# Altium PCB ES.PcbDoc (part 2 of 2)
Units mm, origin at the board's own origin, x right, y up, seen from the top; angles counter-clockwise.
Board outline 100.25 x 100.25 mm, 2 copper layers (Top Layer, Bottom Layer); 101 components, 47 nets, 272 pads, 52 vias.
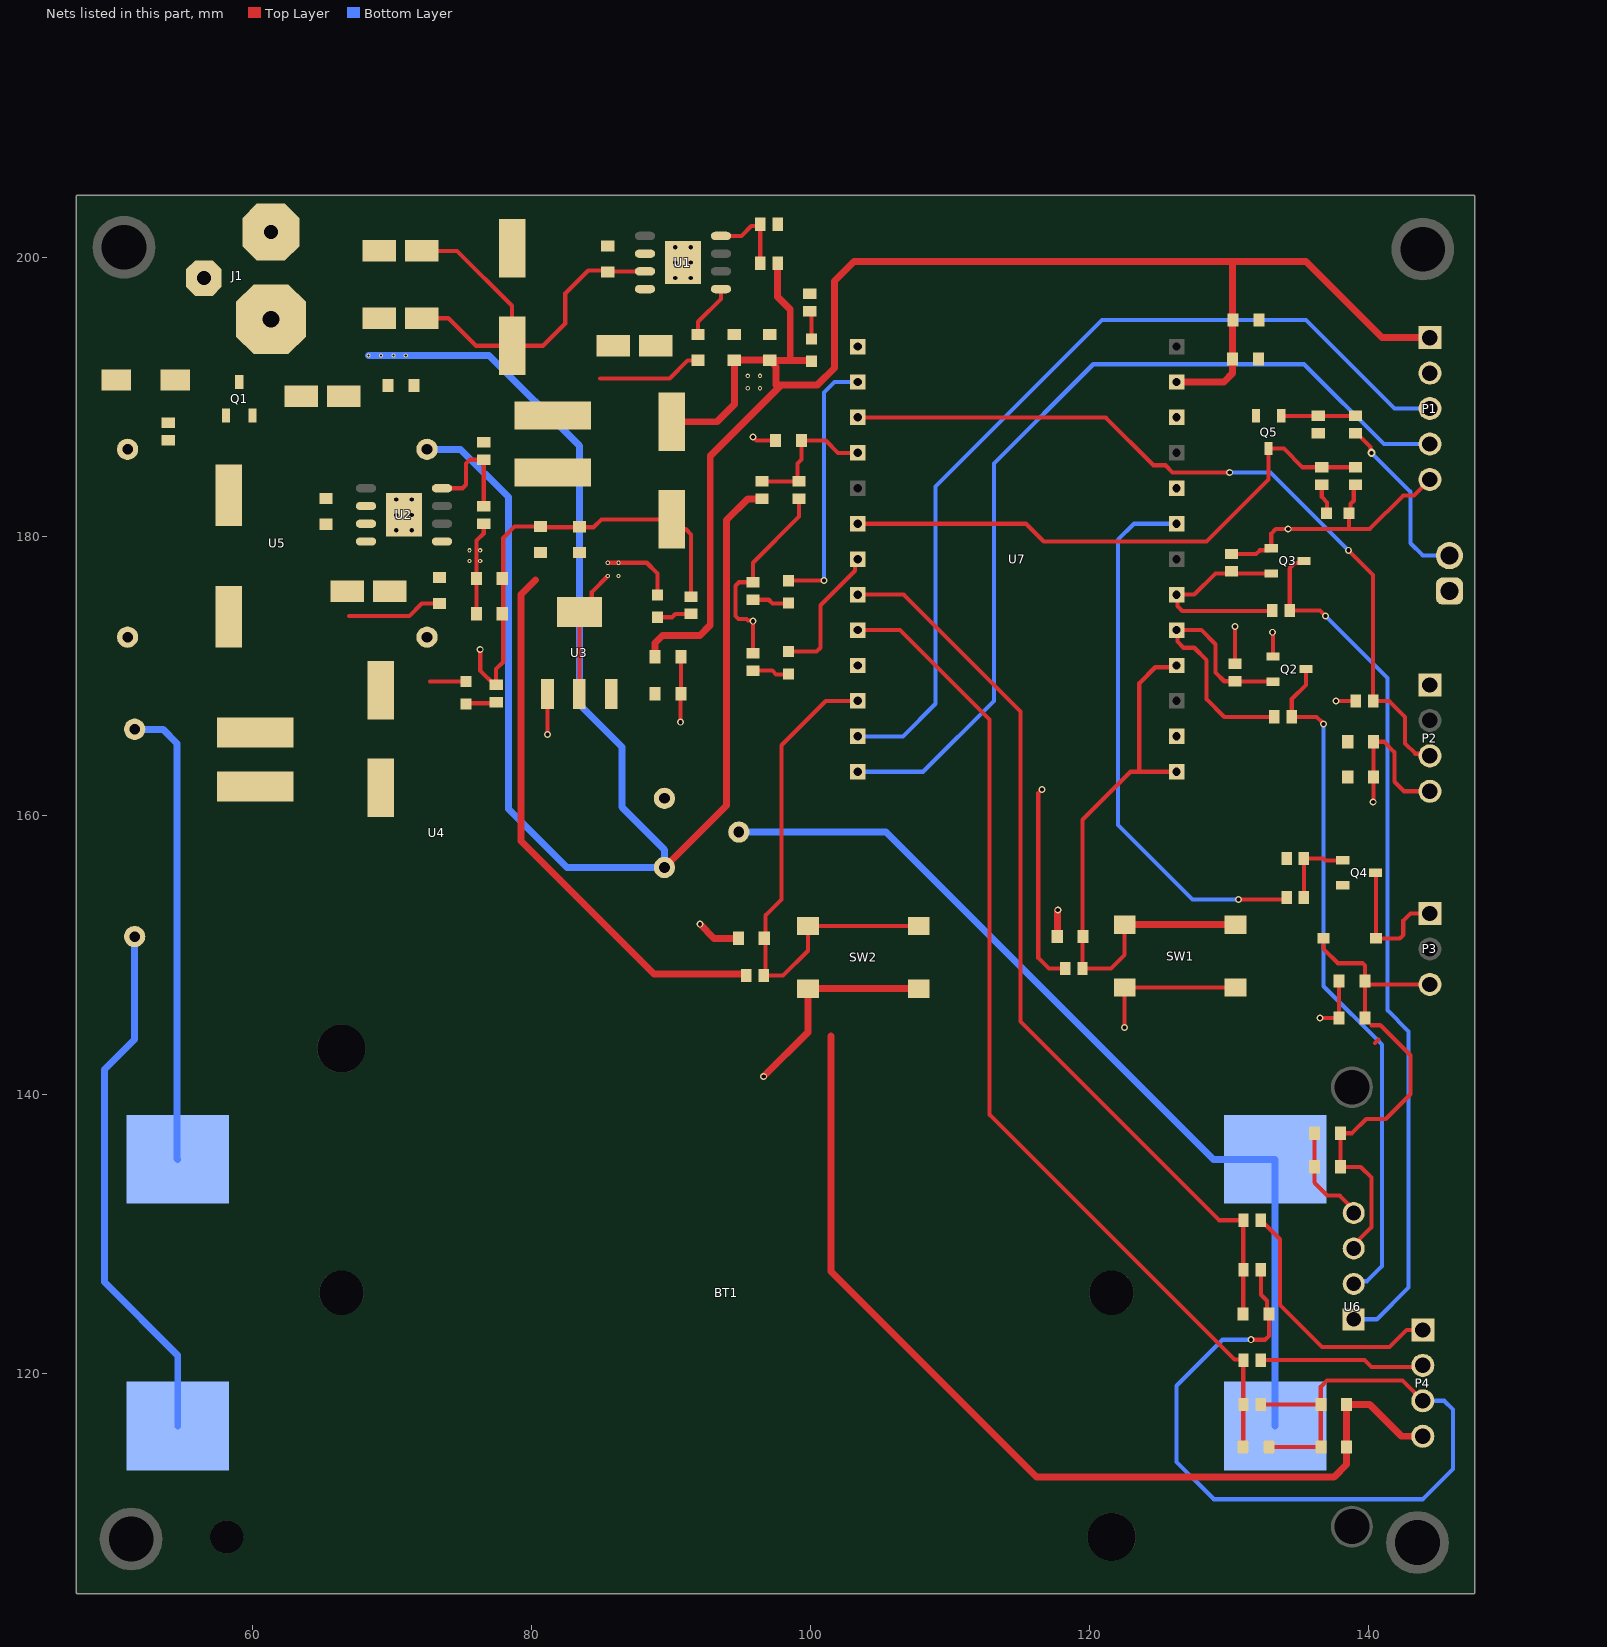
[diagram p2: the nets of this part, all layers, seen from the top]

## Part data (continued)
J1: "Power Barrel Connector Jack 2mm ID 5.8mm OD Through Hole, Right Angle", LCSC Part #=C5155559, Manufacturer=G-Switch, Operating Temperature Max="+85 C", Operating Temperature Min="-40 C", Rated Current=7A, Supplier 1 Part Number=N/A, Voltage Rating DC=35V, ComponentLink1Description="Datasheet link", ComponentLink1URL=https://www.lcsc.com/datasheet/C5155559.pdf, Manufacturer Part Number=DC-005H-D020, Mount=THT, Number of Pins=3, Packaging="Through Hole", Supplier 1=Mouser, Supplier 1 URL=N/A, Supplier 2=Digi-Key, Supplier 2 Part Number=N/A, Supplier 2 URL=N/A, Supplier 3=thegioiic, Supplier 3 Part Number=N/A, Supplier 3 URL=N/A
J2: library part 691210910002, "WR-TBL Series 2109 Horizontal Entry, THT, pitch 2.54mm, 2p", LCSC Part #=N/A, Manufacturer="Wurth Elektronik", Operating Temperature Max=105°C, Operating Temperature Min=-40°C, Rated Current=6A, Working Voltage=150V, Application="Rising Cage Clamp", Category="Terminal Blocks", ComponentLink1Description=Datasheet, ComponentLink1URL=https://www.we-online.com/redexpert/spec/691210910002?ad, Manufacturer Part Number=691210910002, Match Code=WR-TBL, Modularity=No, Mount="Through Hole", Number of Pins=2, Number of Rows=1, Orientation=Horizontal, Packaging=Box, Pitch=2.54mm, Supplier 1=Mouser, Supplier 1 Part Number=N/A, Supplier 1 URL=N/A, Supplier 2=Digi-Key, Supplier 2 Part Number=N/A, Supplier 2 URL=N/A, Supplier 3=thegioiic, Supplier 3 Part Number=N/A, Supplier 3 URL=https://www.thegioiic.com/kf128-2-v-domino-2-chan-thang-2-54mm-150v-6a-han-pcb
L1: library part 784774116, "WE-PD2A SMT Power Inductor, size 5832, 15uH, 1.53A", DC Resistance max.=0.14Ohm, DC Resistance typ.=0.089Ohm, Inductance=15uH, LCSC Part #=N/A, Manufacturer="Wurth Elektronik", Manufacturer Part Number=784774115, Operating Temperature="-40 to +125degC", Rated Current=1.53A, Rated Voltage=80VDC, Saturation Current=1.9A, Self Resonant Frequency=20MHz, Supplier 1 Part Number=710-784774115, Supplier 2 Part Number=732-6832-2-ND, ComponentLink1Description=Datasheet, ComponentLink1URL=https://www.we-online.com/catalog/datasheet/784774156.pdf, Mount=SMD/SMT, Packaging="Tape and Reel", Published Date="May 2020", Size=5848, Supplier 1=Mouser, Supplier 1 URL=https://www.mouser.vn/ProductDetail/Wurth-Elektronik/784774115?qs=sBf%2Fb4nBSleoo7TtqR8SIg%3D%3D, Supplier 2=Digi-Key, Supplier 2 URL=https://www.digikey.com/en/products/detail/w%C3%BCrth-elektronik/784774115/5168867?s=N4IgTCBcDaIOwA4Asc5IIzoKwgLoF8g, Supplier 3=thegioiic, Supplier 3 Part Number=N/A, Supplier 3 URL=https://www.thegioiic.com/cuon-cam-dan-smd-cd53-5852-150-15uh-1-7a
L2: library part 784774068, "WE-PD2A SMT Power Inductor, size 5848, 6.8uH, 2.4A", DC Resistance max.=0.082Ohm, DC Resistance typ.=0.071Ohm, Inductance=6.8uH, LCSC Part #=N/A, Manufacturer="Wurth Elektronik", Operating Temperature="-40 to +125degC", Rated Current=2.4A, Rated Voltage=80VDC, Saturation Current=5A, Self Resonant Frequency=28MHz, Supplier 1 Part Number=710-784774068, Supplier 2 Part Number=732-6829-2-ND, ComponentLink1Description=Datasheet, ComponentLink1URL=https://www.we-online.com/catalog/datasheet/784774156.pdf, Manufacturer Part Number=784774068, Mount=SMD/SMT, Packaging="Tape and Reel", Published Date="May 2020", Size=5848, Supplier 1=Mouser, Supplier 1 URL=https://www.mouser.vn/ProductDetail/Wurth-Elektronik/784774068?qs=sBf%2Fb4nBSlfEjoZazogbYQ%3D%3D, Supplier 2=Digi-Key, Supplier 2 URL=https://www.digikey.com/en/products/detail/w%C3%BCrth-elektronik/784774068/5168865?s=N4IgTCBcDaIOwA4Asc5IAwDYEgLoF8g, Supplier 3=thegioiic, Supplier 3 Part Number=N/A, Supplier 3 URL=https://www.thegioiic.com/cuon-cam-dan-smd-cd53-5852-6r8-6-8uh-2-2a
P1: library part 61300511021, "WR-PHD Pin Header, THT, pitch 2.54mm, Single Row, Angled, 5p", Contact Resistance=20mOhm, LCSC Part #=N/A, Manufacturer="Wurth Elektronik", Operating Temperature Max="+ 85 C", Operating Temperature Min="- 25 C", Rated Current=3A, Supplier 1 Part Number=710-61300511021, Withstanding Voltage=500VAC, Working Voltage=250VAC, ComponentLink1Description=Datasheet, ComponentLink1URL=https://www.we-online.com/catalog/datasheet/61300511021.pdf, Gender="Pin Header", Manufacturer Part Number=61300511021, Mount=THT, Orientation=Angled, Packaging=Bag, Pin Number=5, Pitch=2.54mm, Row Number=Single, Supplier 1=Mouser, Supplier 1 URL=https://www.mouser.vn/ProductDetail/Wurth-Elektronik/61300511021?qs=PhR8RmCirEazneNRFf2Thg%3D%3D, Supplier 2=Digi-Key, Supplier 2 Part Number=N/A, Supplier 2 URL=N/A, Supplier 3=thegioiic, Supplier 3 Part Number=N/A, Supplier 3 URL=N/A
P2 P4: library part 61300411021, "WR-PHD Pin Header, THT, pitch 2.54mm, Single Row, Angled, 4p", Contact Resistance=20mOhm, LCSC Part #=N/A, Manufacturer="Wurth Elektronik", Operating Temperature Max="+ 85 C", Operating Temperature Min="- 25 C", Rated Current=3A, Supplier 1 Part Number=710-61300411021, Withstanding Voltage=500VAC, Working Voltage=250VAC, ComponentLink1Description=Datasheet, ComponentLink1URL=https://www.we-online.com/catalog/datasheet/61300411021.pdf, Gender="Pin Header", Manufacturer Part Number=61300411021, Mount=THT, Orientation=Angled, Packaging=Bag, Pin Number=4, Pitch=2.54mm, Row Number=Single, Supplier 1=Mouser, Supplier 1 URL=https://www.mouser.vn/ProductDetail/Wurth-Elektronik/61300411021?qs=PhR8RmCirEZA1t3zcLZqlA%3D%3D, Supplier 2=Digi-Key, Supplier 2 Part Number=N/A, Supplier 2 URL=N/A, Supplier 3=thegioiic, Supplier 3 Part Number=N/A, Supplier 3 URL=N/A
P3: library part 61300311021, "WR-PHD Pin Header, THT, pitch 2.54mm, Single Row, Angled, 3p", Contact Resistance=20mOhm, LCSC Part #=N/A, Manufacturer="Wurth Elektronik", Operating Temperature Max="+ 85 C", Operating Temperature Min="- 25 C", Rated Current=3A, Supplier 1 Part Number=710-61300311021, Withstanding Voltage=500VAC, Working Voltage=250VAC, ComponentLink1Description=Datasheet, ComponentLink1URL=https://www.we-online.com/catalog/datasheet/61300311021.pdf, Gender="Pin Header", Manufacturer Part Number=61300311021, Mount=THT, Orientation=Angled, Packaging=Bag, Pin Number=3, Pitch=2.54mm, Row Number=Single, Supplier 1=Mouser, Supplier 1 URL=https://www.mouser.vn/ProductDetail/Wurth-Elektronik/61300311021?qs=PhR8RmCirEbNJ%252BPpVpFqFw%3D%3D, Supplier 2=Digi-Key, Supplier 2 Part Number=N/A, Supplier 2 URL=N/A, Supplier 3=thegioiic, Supplier 3 Part Number=N/A, Supplier 3 URL=N/A
Q1: "MOSFET MOSFT P-Ch -30V -3A 98mOhm 9.5nC Log Lvl", Continuous Drain Current="-3 A", Drain to Source Voltage (Vdss)="-30 V", Drain-to-Source On-Resistance="165 mOhms", Gate Threshold Voltage (Vth)="-4 V", Gate-to-Source Voltage (VGS)=±20V, LCSC Part #=C2592, Manufacturer="Infineon Technologies", Operating Temperature Max="+ 150 C", Operating Temperature Min="- 55 C", Package / Case=SOT-23-3, Power Dissipation="1.25 W", Supplier 1 Part Number=942-IRLML5203TRPBF, Supplier 2 Part Number=N/A, ComponentLink1Description=Datasheet, ComponentLink1URL=https://www.mouser.com/datasheet/2/196/Infineon_IRLML5203_DataSheet_v01_01_EN-3363405.pdf, FET Type=P-Channel, Manufacturer Part Number=IRLML5203TRPBF, Mount=SMD/SMT, Packaging="Tape and Reel", Supplier 1=Mouser, Supplier 1 URL=https://www.mouser.com/ProductDetail/Infineon-Technologies/IRLML5203TRPBF?qs=9%252BKlkBgLFf2C8TWZ3Ajzqg%3D%3D, Supplier 2=Digi-Key, Supplier 2 URL=N/A, Supplier 3=thegioiic, Supplier 3 Part Number=N/A, Supplier 3 URL=N/A, Total Gate Charge="9.5 nC"
Q2 Q3 Q4 Q5: "MOSFETs 300mW 50V DSS", Continuous Drain Current="200 mA", Drain to Source Voltage (Vdss)="50 V", Drain-to-Source On-Resistance="3.5 Ohms", Gate Threshold Voltage (Vth)="1.2 V", Gate-to-Source Voltage (VGS)=±20V, LCSC Part #=C40912, Manufacturer="Diodes Incorporated", Operating Temperature Max="+ 150 C", Operating Temperature Min="- 50 C", Package / Case=SOT-23-3, Power Dissipation="300 mW", Supplier 1 Part Number=621-BSS138-7-F, Supplier 2 Part Number=BSS138-FDITR-ND, Supplier 3 Part Number=N/A, ComponentLink1Description=Datasheet, ComponentLink1URL=https://www.mouser.com/datasheet/2/115/ds30144-3214779.pdf, FET Type=N-Channel, Manufacturer Part Number=BSS138-7-F, Mount=SMD/SMT, Packaging="Tape and Reel", Supplier 1=Mouser, Supplier 1 URL=https://www.mouser.com/ProductDetail/Diodes-Incorporated/BSS138-7-F?qs=TJSU9qitBVRAP5gIAnNy0g%3D%3D, Supplier 2=Digi-Key, Supplier 2 URL=https://www.digikey.com/en/products/detail/diodes-incorporated/BSS138-7-F/717723, Supplier 3=thegioiic, Supplier 3 URL=N/A, Total Gate Charge=N/A
R1 R4 R15 R19 R27: library part 0006031031, "RES, size 0603, 10 kOhm, 1/10 W, 1%", LCSC Part #=C98220, Manufacturer=YAGEO, Manufacturer Part Number=RC0603FR-0710KL, Operating Temperature Max="+ 85 C", Operating Temperature Min="- 40 C", Package / Case=0603, Rated Power="1/10 W", Resistance="10 kOhm", Supplier 1 Part Number=N/A, Supplier 2 Part Number=311-10.0KHRTR-ND, Tolerance=+/-1%, ComponentLink1Description=Datasheet, ComponentLink1URL=https://fscdn.rohm.com/en/products/databook/datasheet/passive/resistor/chip_resistor/esr-e.pdf, Mount=SMD/SMT, Packaging="Tape and Reel", Supplier 1=Mouser, Supplier 1 URL=N/A, Supplier 2=Digi-Key, Supplier 2 URL=https://www.digikey.com/en/products/detail/yageo/rc0603fr-0710kl/726880, Supplier 3=thegioiic, Supplier 3 Part Number=N/A, Supplier 3 URL=https://www.thegioiic.com/dien-tro-10-kohm-0603-1-
R2: library part 0006031045, "RES, size 0603, 100 kOhm, 1/10 W, 5%", LCSC Part #=C100048, Manufacturer=YAGEO, Manufacturer Part Number=RC0603JR-07100KL, Operating Temperature Max="+ 85 C", Operating Temperature Min="- 40 C", Package / Case=0603, Rated Power="1/10 W", Resistance="100 kOhm", Supplier 1 Part Number=603-RC0603JR-07100KL, Supplier 2 Part Number=311-100KGRTR-ND, Supplier 3 Part Number=OEM, Tolerance=+/-5%, ComponentLink1Description=Datasheet, ComponentLink1URL=https://www.mouser.vn/datasheet/2/447/YAGEO_PYu_RC_Group_51_RoHS_L_12-3313492.pdf, Mount=SMD/SMT, Packaging="Tape and Reel", Supplier 1=Mouser, Supplier 1 URL=https://www.mouser.vn/ProductDetail/YAGEO/RC0603JR-07100KL?qs=2cAdsCoAWRG9Rhqklpdeqg%3D%3D, Supplier 2=Digi-Key, Supplier 2 URL=https://www.digikey.com/en/products/detail/yageo/rc0603jr-07100kl/726698, Supplier 3=thegioiic, Supplier 3 URL=https://www.thegioiic.com/dien-tro-100-kohm-0603-5
R3 R5: library part 0006033321, "RES, size 0603, 3.3 kOhm, 1/10 W, 1%", LCSC Part #=C108078, Manufacturer=YAGEO, Manufacturer Part Number=RC0603FR-073K3L, Operating Temperature Max="+ 85 C", Operating Temperature Min="- 40 C", Package / Case=0603, Rated Power="1/10 W", Resistance="3.3 kOhm", Supplier 1 Part Number=603-RC0603FR-073K3L, Supplier 2 Part Number=311-3.30KHRTR-ND, Supplier 3 Part Number=N/A, Tolerance=+/-1%, ComponentLink1Description=Datasheet, ComponentLink1URL=https://api.pim.na.industrial.panasonic.com/file_stream/main/fileversion/4484, Mount=SMD/SMT, Packaging="Tape and Reel", Supplier 1=Mouser, Supplier 1 URL=https://www.mouser.vn/ProductDetail/YAGEO/RC0603FR-073K3L?qs=gt6vzsuosg2EoNiKbtAsfQ%3D%3D, Supplier 2=Digi-Key, Supplier 2 URL=https://www.digikey.com/en/products/detail/yageo/rc0603fr-073k3l/727126, Supplier 3=thegioiic, Supplier 3 URL=https://www.thegioiic.com/dien-tro-3-3-kohm-0603-1-
R6 R8 R10 R16 R17 R20 R21: library part 0006033011, "RES, size 0603, 300 Ohm, 1/10 W, 1%", LCSC Part #=N/A, Manufacturer=OEM, Operating Temperature Max="+ 85 C", Operating Temperature Min="- 40 C", Package / Case=0603, Rated Power="1/10 W", Resistance="300 Ohm", Supplier 1 Part Number=755-SDR03EZPF3000, Supplier 2 Part Number=13-RC0603FR-10300RLTR-ND, Tolerance=+/-1%, ComponentLink1Description=Datasheet, ComponentLink1URL=N/A, Manufacturer Part Number=OEM, Mount=SMD/SMT, Packaging="Tape and Reel", Supplier 1=Mouser, Supplier 1 URL=https://www.mouser.vn/ProductDetail/ROHM-Semiconductor/SDR03EZPF3000?qs=MyNHzdoqoQKYsGXohuNk8Q%3D%3D, Supplier 2=Digi-Key, Supplier 2 URL=https://www.digikey.com/en/products/detail/yageo/RC0603FR-10300RL/14008461, Supplier 3=thegioiic, Supplier 3 Part Number=N/A, Supplier 3 URL=N/A
R7: library part 0006034731, "RES, size 0603, 47 kOhm, 1/10 W, 1%", LCSC Part #=C105579, Manufacturer=YAGEO, Manufacturer Part Number=RC0603FR-0747KL, Operating Temperature Max="+ 155 C", Operating Temperature Min="- 55 C", Package / Case=0603, Rated Power="1/10 W", Resistance="47 kOhm", Supplier 1 Part Number=603-RC0603FR-0747KL, Supplier 2 Part Number=311-47.0KHRTR-ND, Supplier 3 Part Number=N/A, Tolerance=+/-1%, ComponentLink1Description=Datasheet, ComponentLink1URL=https://www.mouser.com/datasheet/2/447/YAGEO_PYu_RC_Group_51_RoHS_L_12-3313492.pdf, Mount=SMD/SMT, Packaging="Tape and Reel", Supplier 1=Mouser, Supplier 1 URL=https://www.mouser.com/ProductDetail/YAGEO/RC0603FR-0747KL?qs=gt6vzsuosg3jXzmCiDCCdg%3D%3D, Supplier 2=Digi-Key, Supplier 2 URL=https://www.digikey.com/en/products/detail/yageo/rc0603fr-0747kl/727253, Supplier 3=thegioiic, Supplier 3 URL=N/A
R9: library part 0006031041, "RES, size 0603, 100 kOhm, 1/10 W, 1%", LCSC Part #=C14675, Manufacturer=YAGEO, Manufacturer Part Number=RC0603FR-07100KL, Operating Temperature Max="+ 85 C", Operating Temperature Min="- 40 C", Package / Case=0603, Rated Power="1/10 W", Resistance="100 kOhm", Supplier 1 Part Number=603-RC0603FR-07100KL, Supplier 2 Part Number=311-100KHRTR-ND, Supplier 3 Part Number="100 KOhm 0603 1% (UNI-ROYALOHM)", Tolerance=+/-1%, ComponentLink1Description=Datasheet, ComponentLink1URL=https://www.mouser.vn/datasheet/2/447/YAGEO_PYu_RC_Group_51_RoHS_L_12-3313492.pdf, Mount=SMD/SMT, Packaging="Tape and Reel", Supplier 1=Mouser, Supplier 1 URL=https://www.mouser.vn/ProductDetail/YAGEO/RC0603FR-07100KL?qs=e1ok2LiJcmaihem8Va5%2Fsw%3D%3D, Supplier 2=Digi-Key, Supplier 2 URL=https://www.digikey.com/en/products/detail/yageo/rc0603fr-07100kl/726889, Supplier 3=thegioiic, Supplier 3 URL=https://www.thegioiic.com/dien-tro-100-kohm-0603-1-
R11 R12: library part 0006030001, "RES, size 0603, 0 Ohm, 1/10 W, 1%", LCSC Part #=C192909, Manufacturer=YAGEO, Manufacturer Part Number=AC0603FR-070RL, Operating Temperature Max="+ 85 C", Operating Temperature Min="- 40 C", Package / Case=0603, Rated Power="1/10 W", Resistance="0 Ohm", Supplier 1 Part Number=603-AC0603FR-070RL, Supplier 2 Part Number=311-0.0LDTR-ND, Supplier 3 Part Number=N/A, Tolerance=+/-1%, ComponentLink1Description=Datasheet, ComponentLink1URL=https://www.mouser.com/datasheet/2/447/Yageo_06282023_ACseries-3224032.pdf, Mount=SMD/SMT, Packaging="Tape and Reel", Supplier 1=Mouser, Supplier 1 URL=https://www.mouser.com/ProductDetail/YAGEO/AC0603FR-070RL?qs=sGAEpiMZZMtlubZbdhIBIOG3KwTtqrl%2FD2D%252BGuMCfoY%3D, Supplier 2=Digi-Key, Supplier 2 URL=https://www.digikey.com/en/products/detail/yageo/ac0603fr-070rl/2827812, Supplier 3=thegioiic, Supplier 3 URL=https://www.thegioiic.com/dien-tro-0-ohm-0603-1-
R13 R14: library part 0006034721, "RES, size 0603, 4.7 kOhm, 1/10 W, 1%", LCSC Part #=C99782, Manufacturer=YAGEO, Manufacturer Part Number=RC0603FR-074K7L, Operating Temperature Max="+ 85 C", Operating Temperature Min="- 40 C", Package / Case=0603, Rated Power="1/10 W", Resistance="4.7 kOhm", Supplier 1 Part Number=603-RC0603FR-074K7L, Supplier 2 Part Number=N/A, Tolerance=+/-1%, ComponentLink1Description=Datasheet, ComponentLink1URL=https://www.mouser.vn/datasheet/2/447/YAGEO_PYu_RC_Group_51_RoHS_L_12-3313492.pdf, Mount=SMD/SMT, Packaging="Tape and Reel", Supplier 1=Mouser, Supplier 1 URL=https://www.mouser.vn/ProductDetail/YAGEO/RC0603FR-074K7L?qs=gt6vzsuosg37y0l7Vt36bQ%3D%3D, Supplier 2=Digi-Key, Supplier 2 URL=N/A, Supplier 3=thegioiic, Supplier 3 Part Number=N/A, Supplier 3 URL=N/A
R18 R22 R23 R26: library part 0006031021, "RES, size 0603, 1 kOhm, 1/10 W, 1%", LCSC Part #=C22548, Manufacturer=YAGEO, Manufacturer Part Number=RC0603FR-071KL, Operating Temperature Max="+ 85 C", Operating Temperature Min="- 40 C", Package / Case=0603, Rated Power="1/10 W", Resistance="1 kOhm", Supplier 1 Part Number=603-RC0603FR-071KL, Supplier 2 Part Number=311-1.00KHRTR-ND, Supplier 3 Part Number=N/A, Tolerance=+/-1%, ComponentLink1Description=Datasheet, ComponentLink1URL=https://www.yageo.com/upload/media/product/productsearch/datasheet/rchip/PYu-SR_20105_RoHS_L_10.pdf, Mount=SMD/SMT, Packaging="Tape and Reel", Supplier 1=Mouser, Supplier 1 URL=https://www.mouser.vn/ProductDetail/YAGEO/RC0603FR-071KL?qs=VU8sRB4EgwApHsk4rF%2F3zg%3D%3D, Supplier 2=Digi-Key, Supplier 2 URL=https://www.digikey.com/en/products/detail/yageo/rc0603fr-071kl/726843, Supplier 3=thegioiic, Supplier 3 URL=N/A
R24 R25: library part 0006032235, "RES, size 0603, 22 kOhm, 1/10 W, 5%", LCSC Part #=C114065, Manufacturer=YAGEO, Manufacturer Part Number=RC0603FR-0722KL, Operating Temperature Max="+ 85 C", Operating Temperature Min="- 40 C", Package / Case=0603, Rated Power="1/10 W", Resistance="22 kOhm", Supplier 1 Part Number=603-RC0603FR-0722KL, Supplier 2 Part Number=311-22.0KHRTR-ND, Supplier 3 Part Number=N/A, Tolerance=+/-5%, ComponentLink1Description=Datasheet, ComponentLink1URL=https://www.mouser.vn/datasheet/2/315/Panasonic_Resistors_Thick_Film_Anti_Sulf_Anti_Surg-1825099.pdf, Mount=SMD/SMT, Packaging="Tape and Reel", Supplier 1=Mouser, Supplier 1 URL=https://www.mouser.vn/ProductDetail/YAGEO/RC0603FR-0722KL?qs=diQw95jMAeO86nsIZoklhA%3D%3D, Supplier 2=Digi-Key, Supplier 2 URL=https://www.digikey.com/en/products/detail/yageo/rc0603fr-0722kl/727056, Supplier 3=thegioiic, Supplier 3 URL=https://www.thegioiic.com/dien-tro-22-kohm-0603-5
R28 R29: library part 0006033835, "RES, size 0603, 38 kOhm, 1/10 W, 5%", LCSC Part #=N/A, Manufacturer=OEM, Operating Temperature Max="+ 85 C", Operating Temperature Min="- 40 C", Package / Case=0603, Rated Power="1/10 W", Resistance="38 kOhm", Tolerance=+/-5%, ComponentLink1Description=Datasheet, ComponentLink1URL=N/A, Manufacturer Part Number=OEM, Mount=SMD/SMT, Packaging="Tape and Reel", Supplier 1=Mouser, Supplier 1 Part Number=N/A, Supplier 1 URL=N/A, Supplier 2=Digi-Key, Supplier 2 Part Number=N/A, Supplier 2 URL=N/A, Supplier 3=thegioiic, Supplier 3 Part Number=N/A, Supplier 3 URL=N/A
SW1 SW2: "WS-TASV SMT Tact Switch, L6 x W6 x H4.3mm, 260g, SPST-NO, 12V, 50mA", LCSC Part #=N/A, Manufacturer="Wurth Elektronik", Operating Temperature Max=85°C, Operating Temperature Min=-40°C, Package / Case=0805, Rated Current=50mA, Rated Voltage=12VDC, Supplier 1 Part Number=710-430152043826, Supplier 2 Part Number=732-6991-2-ND, Supplier 3 Part Number=OEM, Category="Tact Switches", Circuit=SPST-NO, ComponentLink1Description=Datasheet, ComponentLink1URL=https://www.we-online.com/redexpert/spec/430152043826?ad, Contact Material="Stainless Steel", Height=4.3mm, Length=6mm, Manufacturer Part Number=430152043826, Match Code=WS-TASV, Mount="Surface Mount", Operation Force=260g, Packaging="Tape and Reel", Supplier 1=Mouser, Supplier 1 URL=https://www.mouser.vn/ProductDetail/Wurth-Elektronik/430152043826?qs=wr8lucFkNMUjBcFj1giTsA%3D%3D, Supplier 2=Digi-Key, Supplier 2 URL=https://www.digikey.com/en/products/detail/w%C3%BCrth-elektronik/430152043826/5208994, Supplier 3=thegioiic, Supplier 3 URL=https://www.thegioiic.com/nut-nhan-6x6mm-cao-4-3mm-4-chan-smd, Terminal Material="Copper Alloy", Terminal Plating=Silver, Washable=No, Width=6mm
U1 U2: library part TPS5430DDAR, "5.5V to 36V Input, 3A, 500kHz Step-Down Converter", LCSC Part #=C9864, Manufacturer="Texas Instruments", Operating Temperature Max="+ 85 C", Operating Temperature Min="- 40 C", Output Current="3 A", Package / Case=WSON-10, Supplier 1 Part Number=595-TPS5430DDAR, Supplier 2 Part Number=296-26988-2-ND, Supplier 3 Part Number=TPS5430DDA, Switching Frequency="500 kHz", Voltage Input Maximum=36V, Voltage Input Minimum=5.5V, Voltage Output="1.22V - 32V", ComponentLink1Description=Datasheet, ComponentLink1URL=https://www.ti.com/lit/gpn/TPS5430, Manufacturer Part Number=TPS5430DDAR, Mount=SMD/SMT, Number of Outputs=1, Packaging="Tape and Reel", Supplier 1=Mouser, Supplier 1 URL=https://www.mouser.com/ProductDetail/Texas-Instruments/TPS5430DDAR?qs=zwk82MlA57ZJdOTovH1aYA%3D%3D, Supplier 2=Digi-Key, Supplier 2 URL=https://www.digikey.com/en/products/detail/texas-instruments/tps5430ddar/1671816, Supplier 3=thegioiic, Supplier 3 URL=https://www.thegioiic.com/tps5430dda-ic-dieu-chinh-giam-ap-3a-8-soic
U3: library part AMS1117-3.3V, "1A 60dB@(120Hz) Fixed 3.3V Positive electrode 12V SOT-223 Linear Voltage Regulators (LDO) ROHS", Current Input Maximum=N/A, Current Output Maximum=1A, LCSC Part #=C347222, Manufacturer=AMS, Operating Temperature Max="+ 85 C", Operating Temperature Min="- 40 C", Voltage Input Maximum=15V, Voltage Output=3.3V, ComponentLink1Description=Datasheet, ComponentLink1URL=http://www.advanced-monolithic.com/pdf/ds1117.pdf, Manufacturer Part Number=N/A, Mount=SMD/SMT, Packaging="Tape and Reel", Pad Count=4, Supplier 1=Mouser, Supplier 1 Part Number=N/A, Supplier 1 URL=N/A, Supplier 2=Digi-Key, Supplier 2 Part Number=N/A, Supplier 2 URL=N/A, Supplier 3=thegioiic, Supplier 3 Part Number=N/A, Supplier 3 URL=https://www.thegioiic.com/ams1117-3-3v-ic-on-ap-3-3v-1a-sot-223
U5: library part TP5100_MODULE
U7: "Embedded serial port to Ethernet module", Package=None, Check_prices=https://www.snapeda.com/parts/WT32-ETH01/Wireless-Tag/view-part/?ref=eda, MF=wireless-tag, MP=WT32-ETH01, SnapEDA_Link=https://www.snapeda.com/parts/WT32-ETH01/Wireless-Tag/view-part/?ref=snap

## Via types
v1: diameter 0.5, hole 0.3, Top Layer to Bottom Layer, 35 vias
v2: diameter 0.3, hole 0.15, Top Layer to Bottom Layer, 16 vias
v3: diameter 0.6, hole 0.3, Top Layer to Bottom Layer, 1 vias

## Nets (pads, with @x,y where several pads share a name; then routed paths per layer and width w, separated by ;. In a path a pad name is that pad's centre, name@x,y a point inside that pad or via, vN(x,y) a via of type N, cw(c..) or ccw(c..) an arc to the next point about the centre after c; other vN are vias at no path point)
3V3: C10.2 C11.2 C21.2 C22.2 D9.2 D13.2 P1.5 P2.4 Q2.1 Q3.1 R13.1 R14.1 R15.2 R16.1 R17.1 R22.2 U3.2 U3.4 | length 107.6
  Top Layer w0.3: U3.2@83.443,168.722 U3.4@83.443,174.582 ; U3.4@84.328,175.457 U3.4@84.318,175.457 ; v2(85.471,177.165) 84.328,176.022 84.328,175.467 U3.4@84.318,175.457 ; v2(85.471,178.12) v2(86.233,178.12) 88.265,178.12 89.033,177.352 D9.2@89.033,175.806 ; v1(116.586,161.864) 116.332,161.61 116.332,149.799 117.088,149.043 R16.1@118.247,149.043 ; R14.1@130.175,178.745 131.943,178.745 132.207,179.009 132.894,179.009 Q3.1@133.032,179.147 133.032,180.215 133.35,180.533 v1(134.239,180.533) 138.557,180.533 ; R13.1@130.429,170.871 v1(130.429,173.548) ; v1@133.096,173.167 133.159,173.104 Q2.1@133.159,171.4 ; v1(137.668,168.214) R15.2@139.075,168.214 ; R22.2@139.065,183.708 138.938,183.581 138.938,182.565 138.713,182.34 138.713,181.784 D13.2@138.595,181.666 138.595,180.571 138.557,180.533 ; v1(140.335,160.975) 140.347,160.987 140.347,162.741 C22.2@140.359,162.753 C21.2@140.359,165.293 141.097,165.293 141.859,164.531 141.859,162.42 142.543,161.737 P2.4@144.399,161.737 ; P1.5@144.399,184.089 143.256,182.946 142.494,182.946 140.081,180.533 138.557,180.533 ; U3.4@83.443,174.582 U3.4@84.318,175.457 ; U3.4@83.443,174.582 83.443,175.457 U3.4@84.318,175.457
  Top Layer w0.5: 80.303,176.888 79.248,175.834 79.248,158.181 88.773,148.656 95.262,148.656 95.387,148.531 R17.1@95.387,148.529
  other v1: 133.128,173.135
  other v2: 86.233,177.165
5V: C4.1 C5.2 C6.2 C8.2 C9.2 C19.2 C20.2 C23.2 C24.2 C25.2 C26.2 C29.2 C30.2 D8.2 D10.2 L1.2 P1.1 P3.3 P4.4 R1.2 U3.3 U6.2 U7.5V | length 224.2
  Top Layer w0.3: D10.2@136.779,151.196 136.779,150.434 137.795,149.418 139.56,149.418 139.736,149.242 C25.2@139.736,148.148 C25.2@139.736,148.144 ; C19.2@137.981,134.686 C20.2@137.981,137.232 138.817,137.232 139.833,138.248 141.23,138.248 143.002,140.02 143.002,142.814 140.843,144.973 140.208,144.973 ; C19.2@137.981,134.819 139.44,134.819 140.208,134.051 140.208,130.495 U6.2@138.684,128.971 ; C26.2@139.736,145.481 C25.2@139.736,148.144 ; 140.462,143.703 140.716,143.957 ; P3.3@144.399,147.894 139.986,147.894 C25.2@139.736,148.144
  Top Layer w0.5: C9.2@88.864,171.389 88.864,172.369 89.408,172.913 92.075,172.913 92.818,173.656 92.818,185.782 97.91,190.874 ; C4.1@90.043,188.224 93.289,188.224 94.542,189.477 C6.2@94.542,192.635 C5.2@97.082,192.635 ; R1.2@97.653,199.583 97.653,197.18 98.552,196.281 98.552,192.598 ; D8.2@100.076,192.56 100.038,192.597 98.551,192.597 97.12,192.597 C5.2@97.082,192.635 ; 101.473,144.211 101.473,127.32 116.205,112.588 137.541,112.588 138.431,113.477 C30.2@138.431,114.741 C29.2@138.431,117.789 140.087,117.789 142.367,115.509 P4.4@143.891,115.509 ; U7.5V@126.238,191.074 129.628,191.074 130.253,191.698 C24.2@130.253,192.719 130.253,199.71 ; P1.1@144.399,194.249 140.97,194.249 135.509,199.71 130.253,199.71 ; C5.2@97.082,192.635 97.157,192.635 97.307,192.485 97.307,192.41 97.529,192.188 97.529,190.874 97.91,190.874 ; 97.91,190.874 100.511,190.874 101.727,192.09 101.727,198.313 103.124,199.71 130.253,199.71
  other v2: 95.504,190.627 96.393,190.627 95.504,191.516 96.393,191.516
9.5V: C15.1 C16.2 C17.2 D7.2 L2.2 R4.2 U5.2 | length 9.3
  Top Layer w0.3: 72.727,169.595 D7.2@75.311,169.595 ; C16.2@76.06,174.468 C17.2@76.06,176.983 76.06,179.702 76.581,180.223 R4.2@76.581,180.924
  other v2: 75.565,178.247 76.327,178.247 75.565,179.009 76.327,179.009
BATTERY+: D4.2 R9.2 U4.5 U5.3 | length 123
  Top Layer w0.5: U4.5@89.535,156.276 93.98,160.721 93.98,181.168 95.514,182.702 R9.2@96.52,182.702
  Bottom Layer w0.5: v2(68.326,192.979) v2(69.215,192.979) v2(70.104,192.979) v2(70.993,192.979) 76.962,192.979 83.439,186.502 83.439,167.96 86.487,164.912 86.487,160.594 89.535,157.546 U4.5@89.535,156.276 82.55,156.276 78.359,160.467 78.359,182.819 74.93,186.248 U5.3@72.517,186.248
BUZ_CTRL: R18.1 U7.TXD | length 39.4
  Top Layer w0.3: v1(130.683,153.99) 133.995,153.99 R18.1@134.122,154.117
  Bottom Layer w0.3: U7.TXD@126.238,180.914 123.19,180.914 122.047,179.771 122.047,159.324 127.381,153.99 v1(130.683,153.99)
DATA: P2.3 R15.1 U7.IO4 | length 57.4
  Top Layer w0.3: U7.IO4@103.378,188.534 121.158,188.534 124.587,185.105 125.448,185.105 125.956,184.597 v1(130.048,184.597) ; v1@138.638,178.927 140.325,177.241 R15.1@140.325,168.214 141.478,168.214 142.621,167.071 142.621,165.166 143.353,164.434 144.242,164.434 P2.3@144.399,164.277
  Bottom Layer w0.3: v1(130.048,184.597) 132.969,184.597 v1(138.557,179.009)
EN: C27.2 R16.2 SW1.A1 SW1.A2 U7.EN U7.EN@1 | length 41.9
  Top Layer w0.3: SW1.A1@122.517,152.176 122.517,150.015 121.545,149.043 R16.2@119.497,149.043 119.497,159.695 122.936,163.134 123.571,163.134 ; U7.EN@126.238,163.134 123.571,163.134 ; 126.238,170.754 126.111,170.627 124.714,170.627 123.571,169.484 123.571,163.134
  Top Layer w0.5: SW1.A1@122.517,152.176 SW1.A2@130.467,152.176
FAN_READ: Q5.3 R22.1 R23.1 U7.IO14 | length 40.8
  Top Layer w0.3: U7.IO14@103.378,180.914 115.455,180.914 116.725,179.644 128.397,179.644 132.831,184.078 Q5.3@132.831,186.301 133.932,186.301 135.275,184.958 R22.1@139.065,184.958
GND: C2.1 C3.2 C4.2 C5.1 C6.1 C7.1 C8.1 C9.1 C10.1 C11.1 C13.2 C14.1 C15.2 C16.1 C17.1 C18.1 C19.1 C20.1 C21.1 C22.1 C23.1 C24.1 C25.1 C26.1 C27.1 C28.1 C29.1 C30.1 C31.1 C32.1 D2.2 D5.A D6.2 J1.2 J1.3 J2.1 P1.2 P2.1 P4.3 Q4.2 Q5.2 R2.1 R3.1 R5.1 R6.2 R7.2 R8.2 R10.2 R19.1 R20.2 R21.2 R27.1 R28.1 R29.1 SW1.B1 SW1.B2 SW2.B1 SW2.B2 U1.6 U1.9 U2.6 U2.9 U3.1 U4.3 U5.1 U5.4 U6.1 U7.GND U7.GND@1 U7.GND@2 U7.GND@3 U7.GND@4 | length 167.4
  Top Layer w0.3: v1(76.327,171.897) 76.327,170.4 77.37,169.357 R6.2@77.47,169.357 77.47,170.5 77.978,171.008 77.978,179.898 78.788,180.708 C11.1@80.645,180.708 80.693,180.66 84.455,180.66 85.019,181.224 C4.2@90.043,181.224 90.734,180.533 91.059,180.533 91.44,180.152 R10.2@91.44,175.697 ; v1(81.153,165.801) U3.1@81.153,168.722 ; v1(90.678,166.69) 90.696,166.708 90.696,168.704 C8.1@90.714,168.722 C9.1@90.714,171.389 ; R21.2@95.885,171.638 v1(95.885,173.929) 95.847,173.967 95.522,173.967 95.411,174.078 94.846,174.078 94.634,174.291 94.634,176.469 94.883,176.718 R20.2@95.885,176.718 95.885,178.12 99.187,181.422 R7.2@99.187,182.702 ; v1(95.885,187.137) 96.139,186.883 C18.1@97.5,186.883 ; v1(122.517,144.808) SW1.B1@122.517,147.676 SW1.B2@130.467,147.676 ; v1(131.572,122.428) 132.588,122.428 132.855,122.695 C31.1@132.855,124.266 132.715,124.406 132.715,125.222 132.289,125.648 R28.1@132.289,127.441 ; R29.1@132.289,117.789 C29.1@136.581,117.789 ; C32.1@132.855,114.741 C30.1@136.581,114.741 C29.1@136.581,117.789 ; C20.1@136.131,137.232 C19.1@136.131,134.819 136.131,133.683 137.043,132.771 137.932,132.771 139.065,131.638 U6.1@139.065,131.257 ; v1(136.525,145.481) C26.1@137.886,145.481 C25.1@137.886,148.148 ; P4.3@143.891,118.049 142.433,119.507 137.033,119.507 136.581,119.055 C29.1@136.581,117.789
  Top Layer w0.5: v1(92.075,152.212) 93.091,151.196 C28.1@94.833,151.196 ; v1(96.647,141.29) 99.822,144.465 SW2.B1@99.822,147.585 SW2.B2@107.772,147.585 ; C27.1@117.693,151.329 117.693,153.192 v1(117.729,153.228)
  Bottom Layer w0.3: v1(131.572,122.428) 129.54,122.428 126.238,119.126 126.238,113.665 128.905,110.998 143.891,110.998 146.05,113.157 146.05,117.426 145.428,118.049 P4.3@143.891,118.049
  other v1: 70.316,180.449 71.416,180.449 70.316,181.549 71.416,181.549 70.316,182.649 71.416,182.649 90.313,198.537 91.413,198.537 90.313,199.637 91.413,199.637 90.313,200.737 91.413,200.737
I2C_SCL: Q3.2 R12.2 R14.2 U7.485_EN | length 15.2
  Top Layer w0.3: Q3.2@133.032,177.347 133.021,177.358 129.032,177.358 127.508,175.834 U7.485_EN@126.238,175.834 126.304,175.767 126.304,175.005 126.648,174.662 R12.2@133.106,174.662
I2C_SDA: Q2.2 R11.2 R13.2 U7.CFG | length 21.3
  Top Layer w0.3: Q2.2@133.159,169.6 133.149,169.61 130.44,169.61 R13.2@130.429,169.621 129.657,169.621 129.032,170.246 129.032,172.278 128.016,173.294 U7.CFG@126.238,173.294 126.304,173.227 126.304,172.465 126.746,172.024 127.508,172.024 128.397,171.135 128.397,168.341 128.394,168.338 129.662,167.071 R11.2@133.243,167.071
IO0: C28.2 R17.2 SW2.A1 SW2.A2 U7.IO0 | length 37.5
  Top Layer w0.3: U7.IO0@103.378,168.214 101.092,168.214 97.917,165.039 97.917,153.99 96.774,152.847 96.774,148.666 R17.2@96.637,148.529 97.79,148.529 97.793,148.526 98.041,148.526 99.822,150.307 SW2.A1@99.822,152.085 SW2.A2@107.772,152.085
LCD_SCL: Q3.3 R12.1 U6.4 | length 62.7
  Top Layer w0.3: Q3.3@135.382,178.247 135.232,178.097 134.724,178.097 134.356,177.729 R12.1@134.356,174.691 136.525,174.691 v1(136.906,174.31)
  Bottom Layer w0.3: v1(136.906,174.31) 141.351,169.865 141.351,146.047 142.875,144.523 142.875,126.177 140.589,123.891 U6.4@138.742,123.891
LCD_SDA: Q2.3 R11.1 U6.3 | length 49.3
  Top Layer w0.3: Q2.3@135.509,170.5 135.509,169.357 134.493,168.341 R11.1@134.493,167.071 136.271,167.071 v1@136.652,166.69
  Bottom Layer w0.3: v1(136.779,166.563) 136.779,147.767 140.97,143.576 140.97,127.701 139.894,126.625 139.132,126.625 U6.3@138.938,126.431
LED1: D11.2 U7.IO2 | length 18.7
  Top Layer w0.3: D11.2@98.425,176.827 98.436,176.838 100.954,176.838 v1(100.965,176.85)
  Bottom Layer w0.3: v1(100.965,176.85) 100.965,190.312 101.727,191.074 U7.IO2@103.378,191.074
LED2: D12.2 U7.IO15 | length 9.9
  Top Layer w0.3: D12.2@98.425,171.747 100.434,171.747 100.711,172.024 100.711,175.072 103.185,177.545 103.185,178.18 U7.IO15@103.378,178.374
MQ2_A0: C31.2 R24.2 R28.2 U7.IO36 | length 66
  Top Layer w0.3: U7.IO36@103.378,175.834 106.68,175.834 115.062,167.452 115.062,145.227 129.292,130.997 R24.2@131.039,130.997 131.022,130.98 131.022,124.283 C31.2@131.005,124.266
MQ2_D0: C32.2 R25.1 R29.2 U7.IO39 | length 72.2
  Top Layer w0.3: U7.IO39@103.378,173.294 106.426,173.294 112.84,166.88 112.84,138.559 130.39,121.009 130.994,121.009 R25.1@131.039,120.964 131.022,120.947 131.022,114.758 C32.2@131.005,114.741
NetBT1_N1: BT1.N1 U4.2 | length 33.3
  Bottom Layer w0.5: U4.2@51.562,166.182 53.594,166.182 54.61,165.166 54.61,135.391 BT1.N1@54.65,135.351
NetBT1_N2: BT1.N2 BT1.P1 U4.4 | length 67.3
  Bottom Layer w0.5: U4.4@94.869,158.816 105.41,158.816 128.875,135.351 BT1.P1@133.31,135.351 BT1.N2@133.31,116.241
NetBT1_P2: BT1.P2 U4.1 | length 38.1
  Bottom Layer w0.5: U4.1@51.562,151.323 51.562,143.957 49.403,141.798 49.403,126.558 54.65,121.311 BT1.P2@54.65,116.241
NetC1_1: C1.1 D2.1 L1.1 U1.8 | length 7.6
  Top Layer w0.3: 84.93,191.328 89.916,191.328 91.199,192.61 91.924,192.61 C1.1@91.948,192.635
NetC1_2: C1.2 U1.1 | length 3.9
  Top Layer w0.3: C1.2@91.948,194.485 91.948,195.392 93.588,197.032 U1.1@93.588,197.732
NetC7_2: C7.2 D3.2
NetC12_1: C12.1 D6.1 L2.1 U2.8 | length 6.8
  Top Layer w0.3: 66.929,174.31 71.247,174.31 72.136,175.199 C12.1@73.406,175.199
NetC12_2: C12.2 U2.1
NetD7_1: D7.1 R6.1 | length 2.2
  Top Layer w0.3: D7.1@75.311,167.995 75.367,168.051 77.414,168.051 R6.1@77.47,168.107
NetD8_1: D8.1 R8.1 | length 2
  Top Layer w0.3: R8.1@99.949,196.154 100.076,196.027 D8.1@100.076,194.16
NetD9_1: D9.1 R10.1 | length 2.5
  Top Layer w0.3: D9.1@89.033,174.205 90.066,174.205 90.307,174.447 R10.1@91.44,174.447
NetD10_1: D10.1 P3.1 Q4.3 | length 9.9
  Top Layer w0.3: Q4.3@140.494,155.895 140.529,155.86 D10.1@140.529,151.196 142.24,151.196 142.494,151.45 142.494,152.466 143.002,152.974 P3.1@144.399,152.974
NetD11_1: D11.1 R20.1 | length 2.7
  Top Layer w0.3: R20.1@95.885,175.468 97.013,175.468 97.282,175.199 98.397,175.199 D11.1@98.425,175.227
NetD12_1: D12.1 R21.1 | length 2.7
  Top Layer w0.3: R21.1@95.885,170.388 97.267,170.388 97.536,170.119 98.397,170.119 D12.1@98.425,170.147
NetD13_1: D13.1 R23.2 | length 2.2
  Top Layer w0.3: R23.2@136.652,183.708 136.652,182.819 137.033,182.438 137.033,181.704 D13.1@136.995,181.666
NetJ2_2: J2.2 R26.1 | length 12.7
  Top Layer w0.3: R26.1@139.065,187.391 139.165,187.391 140.151,186.405 140.151,186.051 v3(140.208,185.994)
  Bottom Layer w0.3: v3(140.208,185.994) 143.002,183.2 143.002,179.517 143.891,178.628 J2.2@145.796,178.628
NetP4_1: P4.1 R24.1 | length 18.7
  Top Layer w0.3: R24.1@132.289,130.997 132.289,130.897 132.514,130.672 132.614,130.672 133.659,129.626 133.659,124.908 136.664,121.903 141.509,121.903 142.735,123.129 P4.1@143.891,123.129
NetP4_2: P4.2 R25.2 | length 11.9
  Top Layer w0.3: R25.2@132.289,120.964 139.706,120.964 140.208,120.462 143.764,120.462 P4.2@143.891,120.589
NetQ1_1: Q1.1 R2.2
NetQ4_1: Q4.1 R18.2 R19.2 | length 5.6
  Top Layer w0.3: R18.2@135.372,154.117 R19.2@135.372,156.911 136.779,156.911 136.906,156.784 138.133,156.784 Q4.1@138.144,156.795
NetQ5_1: Q5.1 R26.2 R27.2 | length 5.3
  Top Layer w0.3: Q5.1@133.731,188.651 133.741,188.641 R26.2@139.065,188.641
NetR1_1: R1.1 R3.2 U1.4 | length 6
  Top Layer w0.3: U1.4@93.588,201.542 95.05,201.542 95.754,202.245 96.272,202.245 R3.2@96.403,202.377 R1.1@96.403,199.583
NetR4_1: R4.1 R5.2 U2.4 | length 8.1
  Top Layer w0.3: U2.4@73.591,183.454 75.057,183.454 75.311,183.708 75.311,185.232 75.575,185.496 R5.2@76.581,185.496 R4.1@76.581,182.174
RX_0: P1.3 U7.RX0 | length 65.1
  Bottom Layer w0.3: U7.RX0@103.378,165.674 106.631,165.674 108.966,168.008 108.966,183.581 120.904,195.519 135.509,195.519 141.859,189.169 P1.3@144.399,189.169
TX_0: P1.4 U7.TX0 | length 65.5
  Bottom Layer w0.3: U7.TX0@103.378,163.134 108.077,163.134 113.157,168.214 113.157,185.232 120.269,192.344 135.382,192.344 141.097,186.629 P1.4@144.399,186.629
V_SUPPLY: C2.2 C3.1 D1.1 D4.1 U1.7 | length 31.3
  Top Layer w0.3: D4.1@72.137,195.646 74.041,195.646 76.017,193.67 C3.1@78.613,193.67 ; D1.1@72.137,200.472 74.676,200.472 78.613,196.535 C3.1@78.613,193.67 ; U1.7@88.138,199.002 85.889,199.002 85.816,199.075 84.074,199.075 82.423,197.424 82.423,195.265 80.828,193.67 C3.1@78.613,193.67
VBAT_SENSE: C18.2 R7.1 R9.1 U7.IO35 | length 10.2
  Top Layer w0.3: R9.1@96.52,183.952 R7.1@99.187,183.952 99.06,184.079 99.06,185.232 99.35,185.522 C18.2@99.35,186.883 101.092,186.883 101.981,185.994 U7.IO35@103.378,185.994
VCC: D5.C J1.1 Q1.3
Vin: C13.1 C14.2 D1.2 D3.1 Q1.2 U2.7
pads on no net: BT1. H1.1 H2.1 H3.1 H4.1 P2.2 P3.2 U1.2 U1.3 U1.5 U2.2 U2.3 U2.5 U6. U7.3V3 U7.3V3@1 U7.IO12 U7.LINK U7.RXD

## Polygon pours and split planes (outlines as drawn)
GND on Top Layer "GND_L01_P049" (solid, remove dead copper, pour order 49): 47.625,204.216 147.32,204.216 147.32,104.521 47.625,104.521
5V on Top Layer "5V_L01_P029" (solid, remove dead copper, pour order 29): 93.218,190.566 93.599,190.947 93.599,193.106 98.171,193.106 98.171,190.058 97.409,190.058 94.996,187.645 94.996,185.613 89.154,185.613 89.154,190.566 92.837,190.566
5V on Top Layer "5V_L01_P030" (solid, remove dead copper, pour order 30): 94.869,193.106 111.633,193.106 124.079,180.66 124.079,159.197 134.239,149.037 141.351,149.037 141.351,147.259 141.351,145.481 141.351,143.322 94.869,143.322
5V on Top Layer "5V_L01_P023" (solid, remove dead copper, pour order 23): 84.709,172.151 89.662,172.151 89.662,167.452 84.709,167.452
5V on Top Layer "5V_L01_P019" (solid, remove dead copper, pour order 19): 78.232,186.248 85.598,186.248 88.392,189.042 88.392,190.566 92.202,190.566 92.202,185.613 86.741,185.613 86.233,185.105 86.233,183.2 78.232,183.2
BATTERY+ on Top Layer "BATTERY+_L01_P025" (solid, remove dead copper, pour order 25): 67.564,197.297 70.231,197.297 70.231,194.503 71.501,193.233 71.501,192.217 67.691,192.217 67.564,192.217
3V3 on Top Layer "3V3_L01_P024" (solid, remove dead copper, pour order 24): 84.201,167.452 84.201,172.278 87.503,175.58 87.503,179.263 79.883,179.263 79.883,173.675 80.645,173.675 82.55,171.77 82.55,167.452
NetC1_1 on Top Layer "NETC1_1_L01_P022" (solid, remove dead copper, pour order 22): 89.027,198.186 89.027,196.789 88.392,196.789 87.122,195.519 87.122,193.233 83.82,193.233 83.82,197.043 85.471,197.043 86.614,198.186
V_SUPPLY on Top Layer "V_SUPPLY_L01_P021" (solid, remove dead copper, pour order 21): 89.154,199.329 89.154,198.567 86.36,198.567 85.979,198.186 84.328,198.186 82.931,196.789 82.931,191.709 77.597,191.709 77.597,195.646 80.772,195.646 82.042,196.916 82.042,199.329
NetC1_1 on Top Layer "NETC1_1_L01_P018" (solid, remove dead copper, pour order 18): 78.232,187.391 84.709,187.391 84.709,190.439 85.217,190.947 87.122,190.947 87.122,194.884 83.82,194.884 83.82,192.09 82.423,190.693 78.232,190.693
NetC7_2 on Top Layer "NETC7_2_L01_P017" (solid, remove dead copper, pour order 17): 65.405,191.709 65.405,188.915 70.231,188.915 70.231,191.709
9.5V on Top Layer "9.5V_L01_P016" (solid, remove dead copper, pour order 16): 56.388,163.642 64.262,163.642 67.31,166.69 67.31,171.262 73.152,171.262 75.184,173.294 75.184,179.39 76.708,179.39 76.708,173.294 73.66,170.246 73.66,165.928 68.834,165.928 64.262,161.356 64.262,160.086 56.388,160.086
NetC12_2 on Top Layer "NETC12_2_L01_P014" (solid, remove dead copper, pour order 14): 72.517,180.025 72.517,176.469 74.803,176.469 74.803,180.025
NetC12_1 on Top Layer "NETC12_1_L01_P013" (solid, remove dead copper, pour order 13): 68.199,174.056 63.754,169.611 63.754,164.531 56.388,164.531 56.388,169.23 60.452,169.23 64.643,173.421 64.643,177.231 68.199,177.231
Vin on Top Layer "VIN_L01_P011" (solid, remove dead copper, pour order 11): 55.626,185.74 62.484,185.74 62.484,182.438 63.246,181.676 66.421,181.676 66.802,181.295 68.961,181.295 68.961,180.406 66.802,180.406 66.167,179.771 55.626,179.771
NetC12_1 on Top Layer "NETC12_1_L01_P012" (solid, remove dead copper, pour order 12): 67.183,180.025 64.643,177.485 64.643,175.072 68.199,175.072 68.199,178.628 68.58,179.009 69.088,179.009 69.215,179.136 69.215,180.025
Vin on Top Layer "VIN_L01_P009" (solid, remove dead copper, pour order 9): 61.722,191.836 62.992,193.106 65.278,193.106 66.421,194.249 66.421,202.631 70.485,202.631 70.485,198.821 68.58,198.821 67.183,197.424 67.183,193.995 64.77,191.582 64.77,188.788 61.722,188.788
Vin on Top Layer "VIN_L01_P006" (solid, remove dead copper, pour order 6): 59.055,189.423 61.341,189.423 61.722,189.804 61.722,191.709 64.77,191.709 64.77,188.28 62.484,185.994 62.484,180.66 55.626,180.66 55.626,186.756 58.547,186.756 59.055,187.264
NetQ1_1 on Top Layer "NETQ1_1_L01_P005" (solid, remove dead copper, pour order 5): 52.959,189.423 58.801,189.423 58.801,187.391 52.959,187.391
VCC on Top Layer "Top Layer-VCC" (solid, remove dead copper, pour order 4): 61.087,191.963 62.738,193.614 64.389,193.614 64.389,196.662 63.627,197.424 59.055,197.424 58.166,196.535 58.166,195.138 56.769,193.741 52.959,193.741 52.959,189.804 61.087,189.804
GND on Bottom Layer "GND_L02_P048" (solid, remove dead copper, pour order 48): 47.498,204.343 47.498,104.394 147.447,104.394 147.447,204.343
3V3 on Bottom Layer "3V3_L02_P039" (solid, remove dead copper, pour order 39): 84.45,179.39 84.45,174.564 102.362,174.564 102.362,172.532 114.173,160.721 114.173,160.086 141.478,160.086 146.558,165.166 146.558,197.297 114.3,197.297 96.393,179.39
9.5V on Bottom Layer "9.5V_L02_P027" (solid, remove dead copper, pour order 27): 49.657,187.518 66.548,187.518 69.215,184.851 69.215,180.152 69.85,179.517 76.708,179.517 76.708,177.612 49.657,177.612

## Keep-outs
Keep-Out Layer:
  lines w0.254: 47.498,104.343 147.498,104.343 147.498,204.343 47.498,204.343 47.498,104.343

## Silkscreen, mask and mechanical layers (free items; w line width, h text height)
Top Overlay:
  text "UART" at 143.129,196.298 h1.52
  text "FAN" at 142.24,173.04 h1.52
  text "DHT11" at 141.732,157.927 h1.52
  text "BUZZER" at 144.89,138.496 h1.52 r90
  text "LCD1602" at 142.985,125.476 h1.52 r90
  text "GAS DETECT" at 141.334,113.35 h1.52 r90

## Text inside footprints (layer, text, board x,y; h text height)
C3: Top Overlay "+" at 72.517,192.725 h1.22 r270
C4: Top Overlay "+" at 93.218,189.804 h1.22 r90
C13: Top Overlay "+" at 52.451,183.073 h1.22 r90
C15: Top Overlay "+" at 66.167,171.658 h1.22 r90
D7: Top Overlay "+" at 73.914,170.246 h0.76 r180
D8: Top Overlay "+" at 99.822,190.947 h0.76
D9: Top Overlay "+" at 88.144,176.33 h0.76 r180
D11: Top Overlay "+" at 100.076,177.17 h0.76 r180
D12: Top Overlay "+" at 100.076,172.151 h0.76 r180
D13: Top Overlay "+" at 140.31,181.335 h0.76 r90
P1: Top Overlay "5" at 144.969,182.249 h1.02 r90
U6: Top Overlay "1" at 137.418,123.891 h1.88 r270